# Altium PCB PCB1.PcbDoc
Units mm, origin at the board's own origin, x right, y up, seen from the top; angles counter-clockwise.
Board outline 30 x 20 mm, 2 copper layers (Top Layer, Bottom Layer), stack 1.532 mm thick; 7 components, 3 nets, 14 pads, 0 vias.
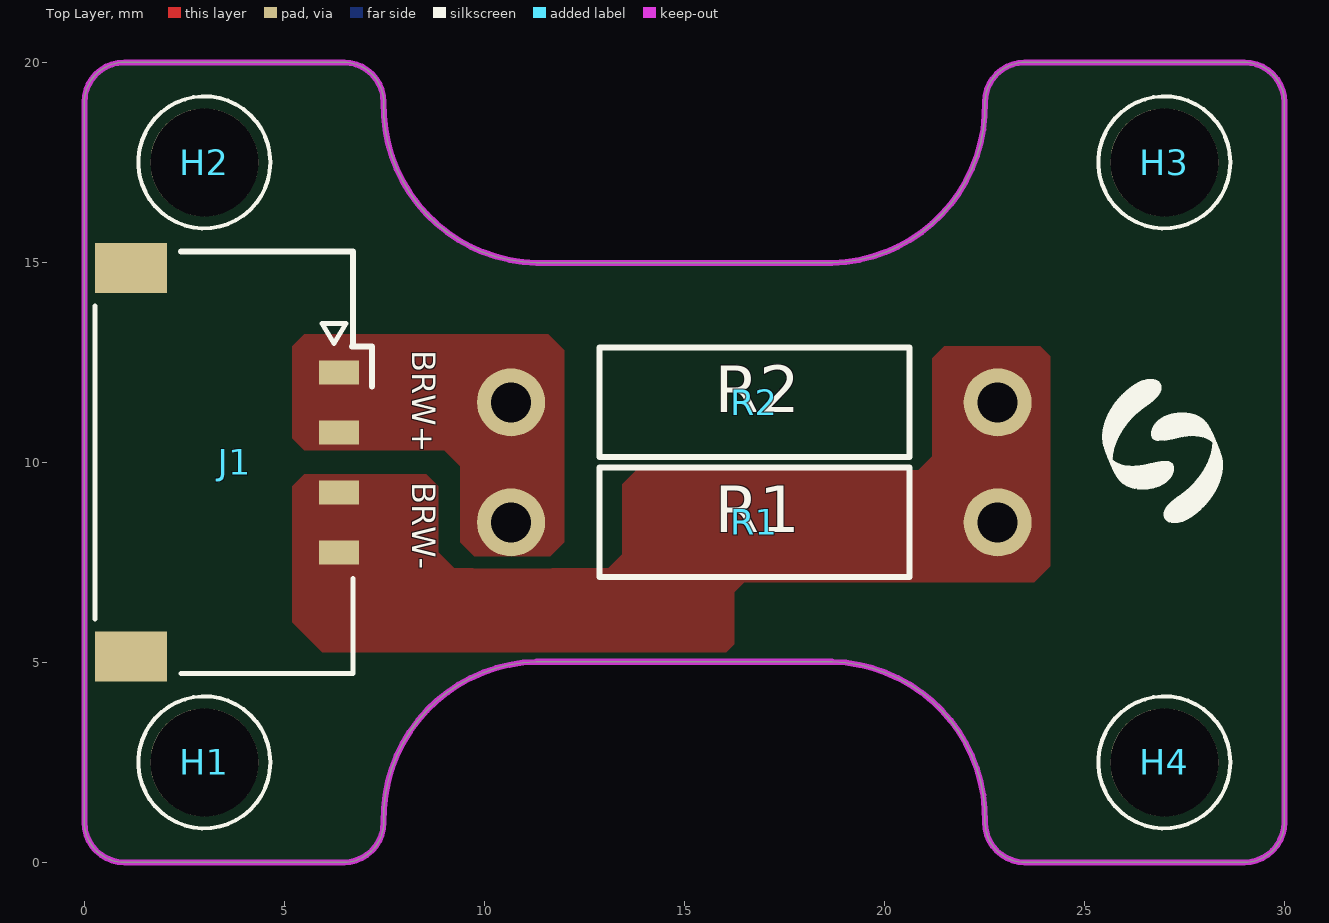
[diagram p0: Top Layer view]
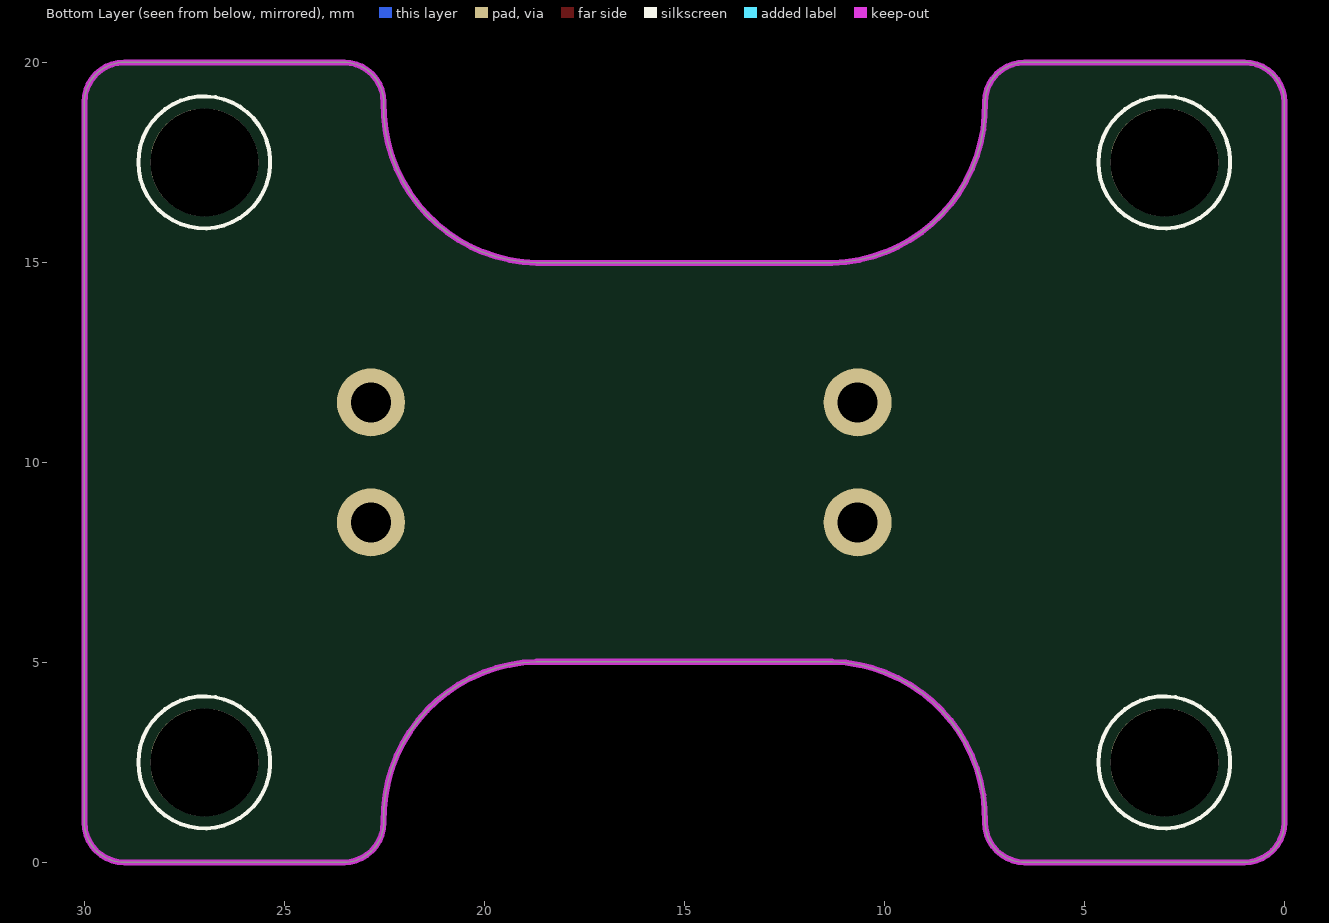
[diagram p1: Bottom Layer view, seen from below]
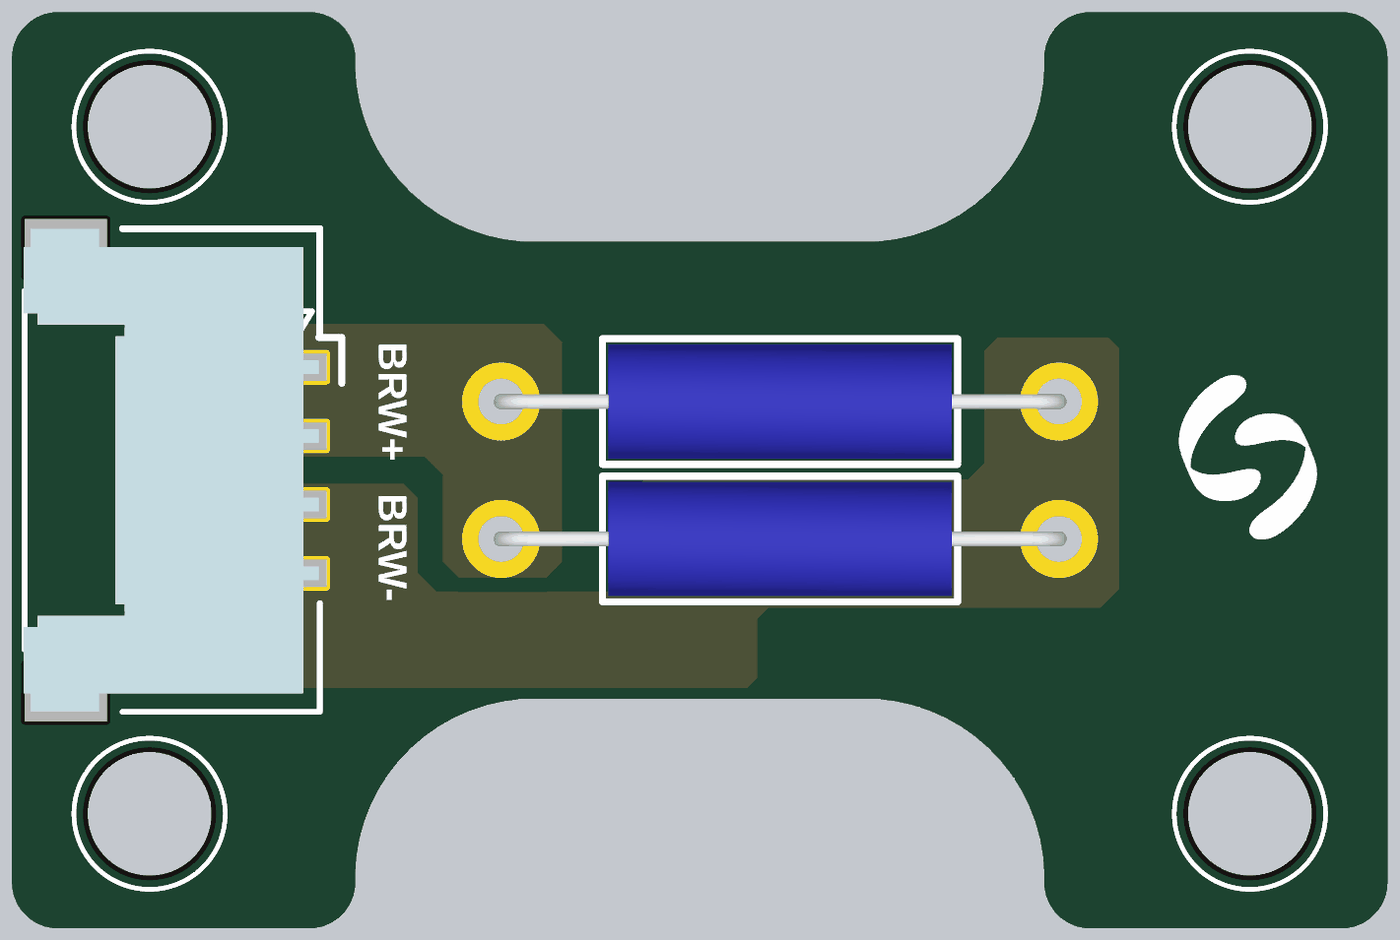
[diagram p2: 3D render of the assembled board from above, using the file's embedded part models]

## Layer stack, top to bottom
Top Solder: solder mask 0.012, Solder Resist, Dk 3.5
Top Layer: signal copper 0.016
Dielectric 1: dielectric 1.5, FR-4, Dk 4.5
Bottom Layer: signal copper 0.016
Bottom Solder: solder mask 0.012, Solder Resist, Dk 3.5

## Board outline
1,0 cw(c1,1) 0,1 0,19 cw(c1,19) 1,20 6.484,20 cw(c6.484,19) 7.484,19 ccw(c11.401,18.903) 11.303,14.986 18.697,14.986 ccw(c18.6,18.903) 22.516,19 cw(c23.516,19) 23.516,20 29,20 cw(c29,19) 30,19 30,1 cw(c29,1) 29,0 23.516,0 cw(c23.516,1) 22.516,1 ccw(c18.6,1.098) 18.697,5.014 11.303,5.014 ccw(c11.401,1.098) 7.484,1 cw(c6.484,1) 6.484,0

## Design rules (kind name [scope] priority, off if disabled: settings)
Clearance [All] p1: gap=0.15 ignorepadtopadclearanceinfootprint=FALSE except(0.3: Poly-Poly)
HoleSize [All] p1: absolutevalues=TRUE maxlimit=3 minlimit=0.025 maxpercent=80.000 minpercent=20.000
PolygonConnect [All] p1: connectstyle=Relief reliefconductorwidth=0.5 reliefentries=4 polygonreliefangle="90 Angle" airgapwidth=0.25
RoutingVias [All] p1: holewidth=0.3 width=0.6 viastyle="Through Hole" minholewidth=0.3 minwidth=0.6 maxholewidth=0.3 maxwidth=0.6
SolderMaskExpansion [All] p1: expansion=0.102 istentingtop=FALSE
Width [All] p1: maxlimit=5 minlimit=0.2 preferedwidth=0.5
29 further rules are at their usual default settings.

## Components (designator, comment, footprint, x,y, rotation, side; value= is the part's Value field where it differs from the comment)
H1 "M3" M3_1 3,2.5 r0 top
H2 "M3" M3_1 3,17.5 r0 top
H3 "M3" M3_1 27,17.5 r0 top
H4 "M3" M3_1 27,2.5 r0 top
J1 "Molex 504050 - 0471" MOLEX_5040500491 3.492,10 r90 top locked
R1 "10R/1W" RES_1000JA100_VIS 10.668,8.5 r0 top locked
R2 "10R/1W" RES_1000JA100_VIS 10.668,11.5 r0 top locked

## Footprints (in the part's own frame and the unit in brackets; to place one, negate y for a bottom-side part, rotate by r counter-clockwise, add the part's x,y. Pads: shape width x height; smd on the part's side, far side on the other; paste and mask are expansions set on the pad)
M3_1 [mm]
  round 2.7 hole 2.7 unplated: 1(0,0)
MOLEX_5040500491 [mm]
  rect 0.6x1 smd mask+0.076: 1(2.25,-2.87) 2(0.75,-2.87) 3(-0.75,-2.87) 4(-2.25,-2.87)
  rect 1.25x1.8 smd mask+0.076: M1(4.855,2.32) M2(-4.855,2.32)
  silkscreen extent -5.28,-3.7 5.28,3.22, body extent -5.27,-3.2 5.28,3.24, height 2
RES_1000JA100_VIS [mm]
  round 1.7 hole 1 paste-2539.97 mask+0: 1(0,0) 2(12.167,0)
  silkscreen extent 2.21,-1.37 9.96,1.37, body extent -0.17,-1.24 12.33,1.24, height 2.49

## Part data
J1: library part "Header 4x1_2M"
R1 R2: library part Res, "Res", Manufacturer="Generic Components", Class=Passive, Published=08/06/2000, Publisher="Altium Hobart Technology Centre", SubClass=R

## Nets (pads, with @x,y where several pads share a name; then routed paths per layer and width w, separated by ;. In a path a pad name is that pad's centre, name@x,y a point inside that pad or via, vN(x,y) a via of type N, cw(c..) or ccw(c..) an arc to the next point about the centre after c; other vN are vias at no path point)
BRW+: J1.1 J1.2 R1.1 R2.1
BRW-: J1.3 J1.4 R1.2 R2.2
GND: 
pads on no net: H1.1 H2.1 H3.1 H4.1 J1.M1 J1.M2

## Polygon pours and split planes (outlines as drawn)
BRW- on Top Layer "NONET_L-01_P-001" (solid, pour order 1): 16.25,6.75 16.5,7 23.75,7 24.15,7.4 24.15,12.65 23.9,12.9 21.5,12.9 21.2,12.6 21.2,11.15 21.2,10.15 20.85,9.8 13.8,9.8 13.45,9.45 13.45,7.7 13.1,7.35 9.25,7.35 8.85,7.75 8.85,9.4 8.55,9.7 5.5,9.7 5.2,9.4 5.2,6 5.95,5.25 16.05,5.25 16.25,5.45
BRW+ on Top Layer "NONET_L-01_P-001" (solid, pour order 0): 5.2,10.6 5.5,10.3 9,10.3 9.4,9.9 9.4,8 9.75,7.65 11.65,7.65 12,8 12,12.8 11.6,13.2 5.5,13.2 5.2,12.9

## Keep-outs
Keep-Out Layer:
  lines w0.15: 6.484,0 ccw(c6.484,1) 7.484,1 cw(c11.401,1.098) 11.303,5.014 ; 6.484,20 cw(c6.484,19) 7.484,19 ccw(c11.401,18.903) 11.303,14.986 ; 6.5,0 1,0 cw(c1,1) 0,1 0,19 cw(c1,19) 1,20 6.5,20 ; 18.697,5.014 cw(c18.6,1.098) 22.516,1 ccw(c23.516,1) 23.516,0 ; 18.697,14.986 ccw(c18.6,18.903) 22.516,19 cw(c23.516,19) 23.516,20 ; 23.5,0 29,0 ccw(c29,1) 30,1 30,19 ccw(c29,19) 29,20 23.5,20
  lines w0.152: 11.303,5.014 18.697,5.014 ; 11.303,14.986 18.697,14.986

## Silkscreen, mask and mechanical layers (free items; w line width, h text height)
Top Overlay:
  drawing of 6 lines, arcs and shapes, not listed
  text "BRW+" at 8,12.8 h1 r270
  text "BRW-" at 8,9.5 h1 r270
Bottom Overlay:
  circle w0.1: c27,2.5 r1.65
  circle w0.1: c27,17.5 r1.65
  circle w0.1: c3,17.5 r1.65
  circle w0.1: c3,2.5 r1.65